# Altium PCB ProbeControl.PcbDoc (part 1 of 2)
Units mm, origin at the board's own origin, x right, y up, seen from the top; angles counter-clockwise.
Board outline 75 x 40.82 mm, 6 copper layers (L1, L2, L3, L4, L5, L6), stack 1.539 mm thick; 83 components, 74 nets, 352 pads, 245 vias.
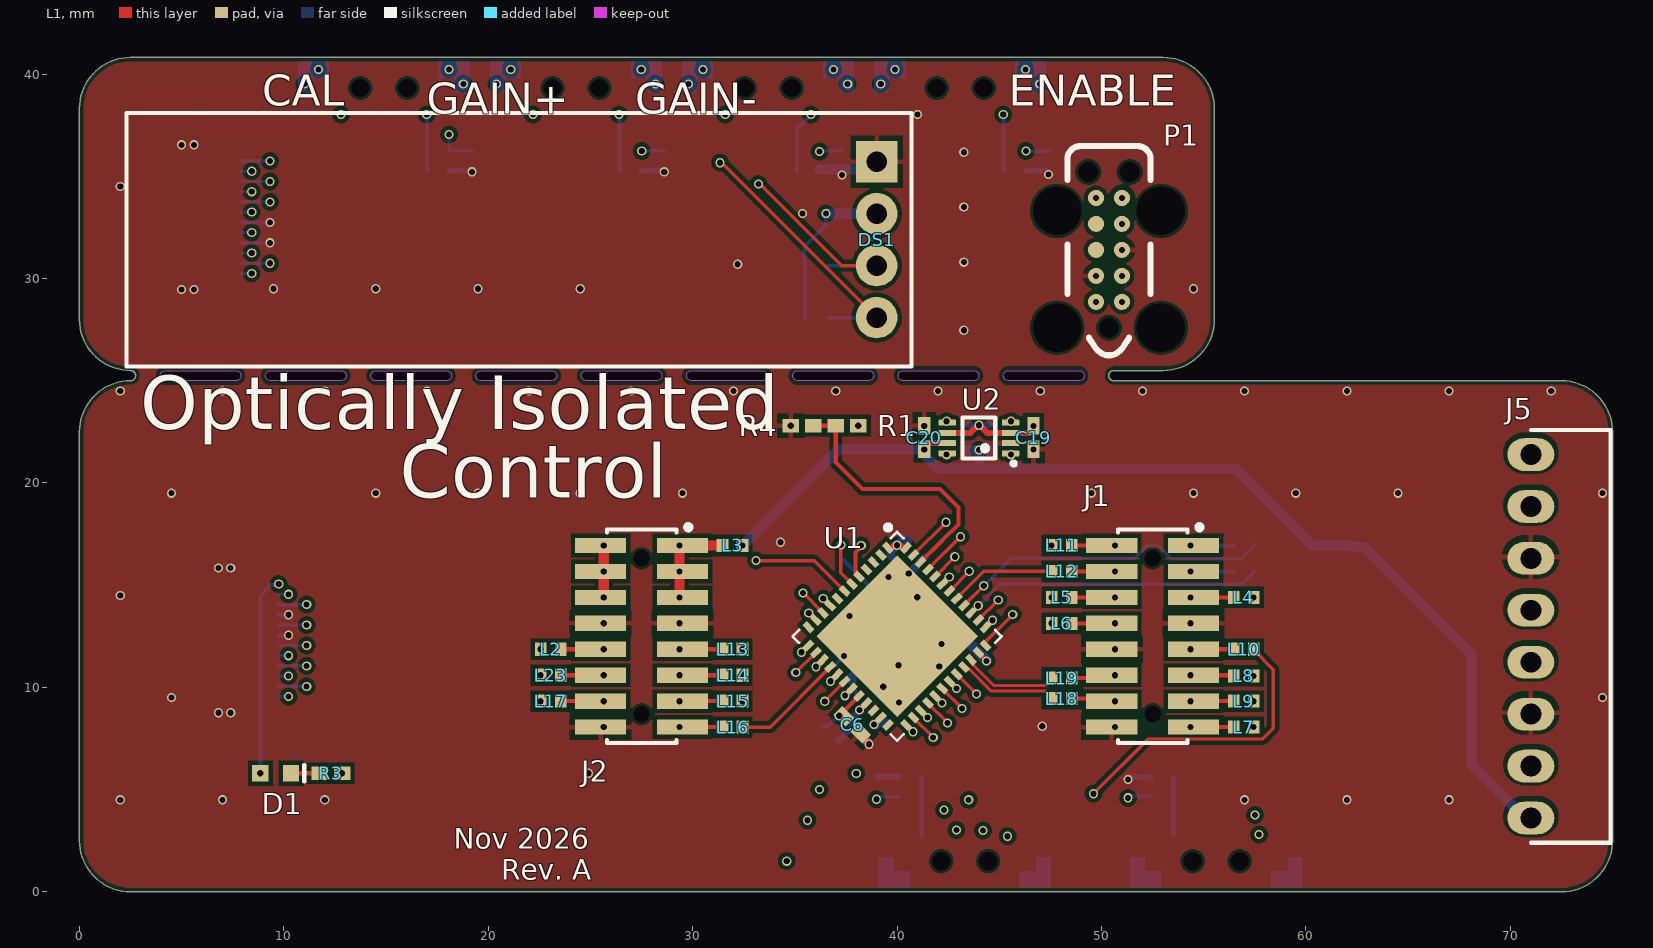
[diagram p0: L1 view]
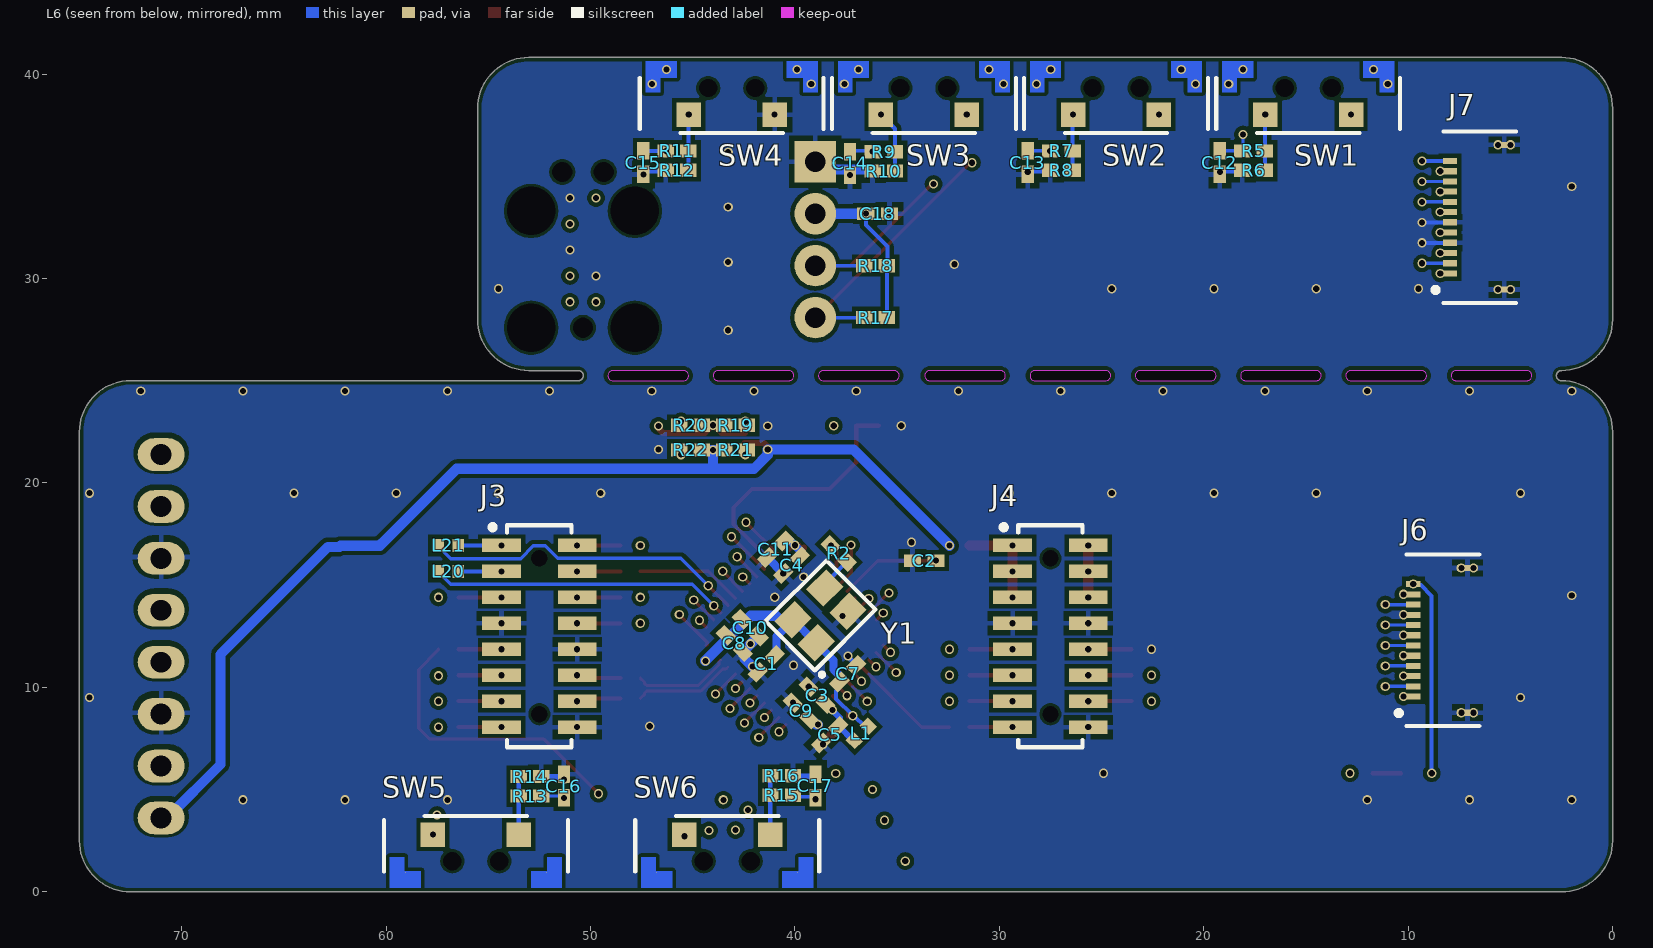
[diagram p1: L6 view, seen from below]
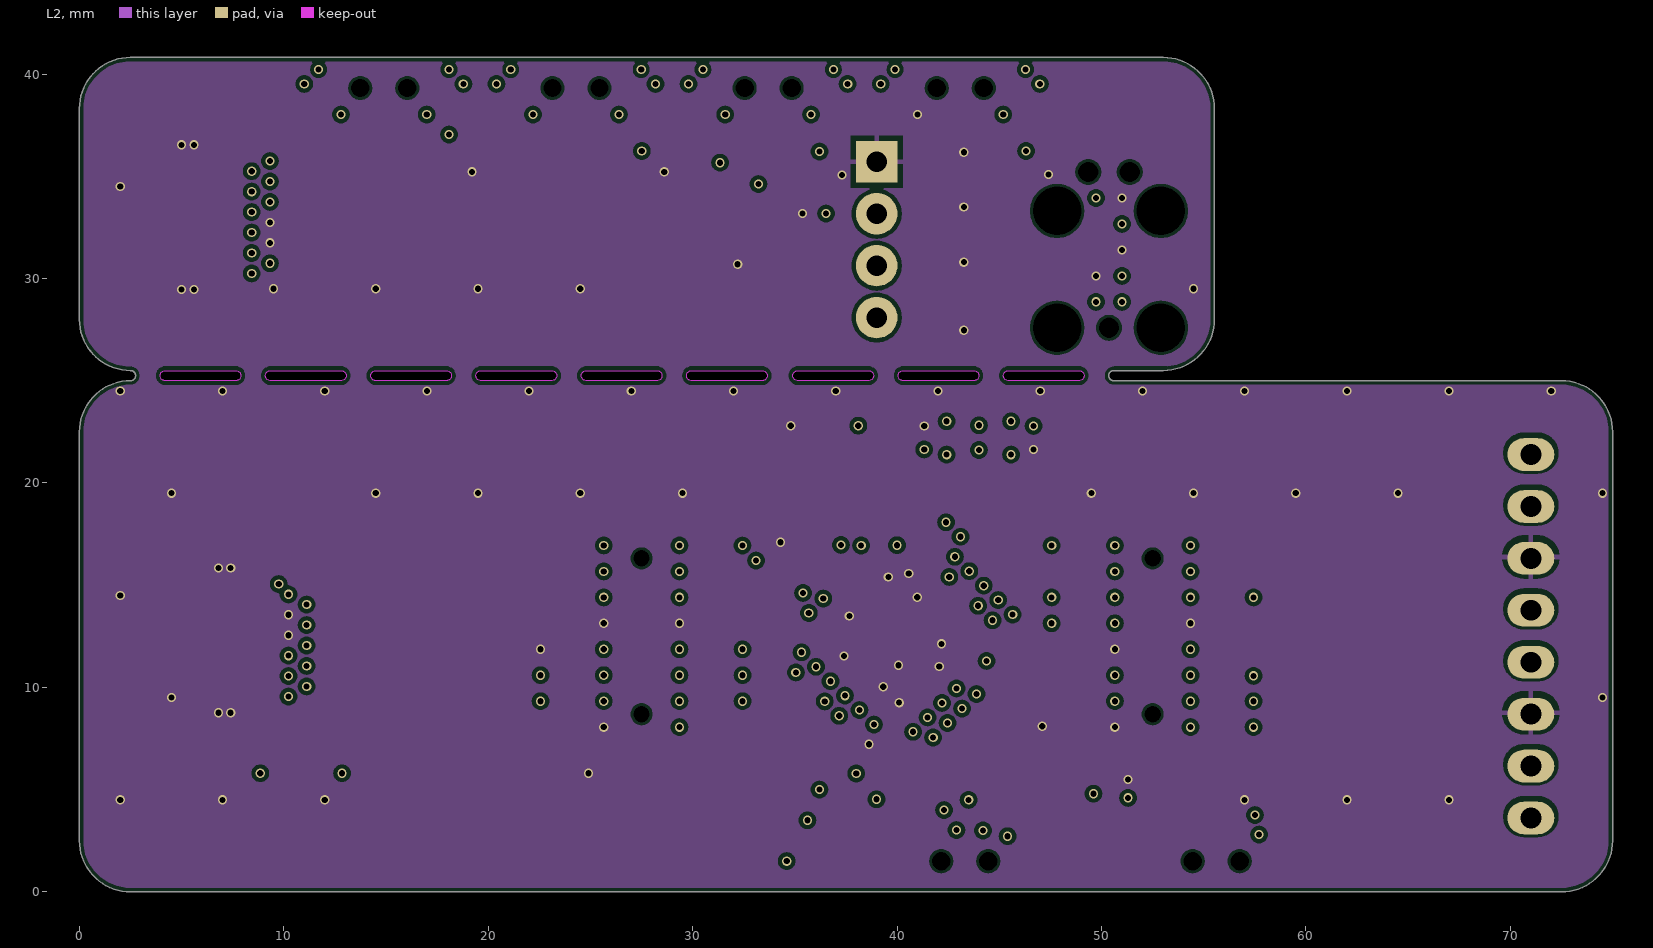
[diagram p2: L2]
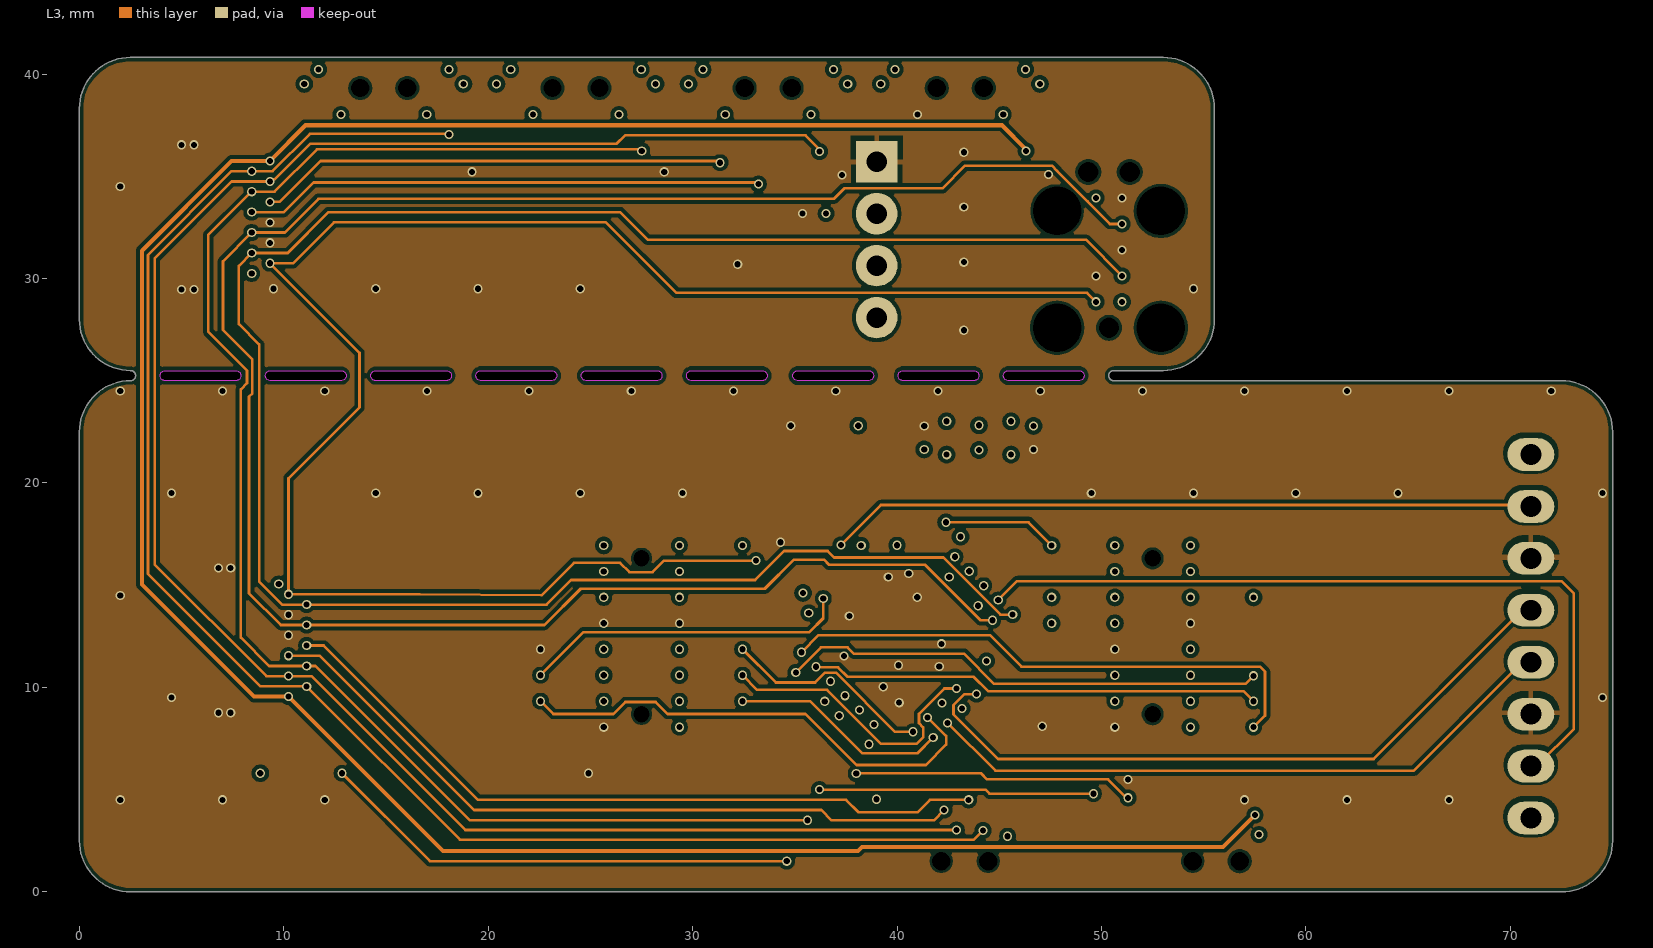
[diagram p3: L3]
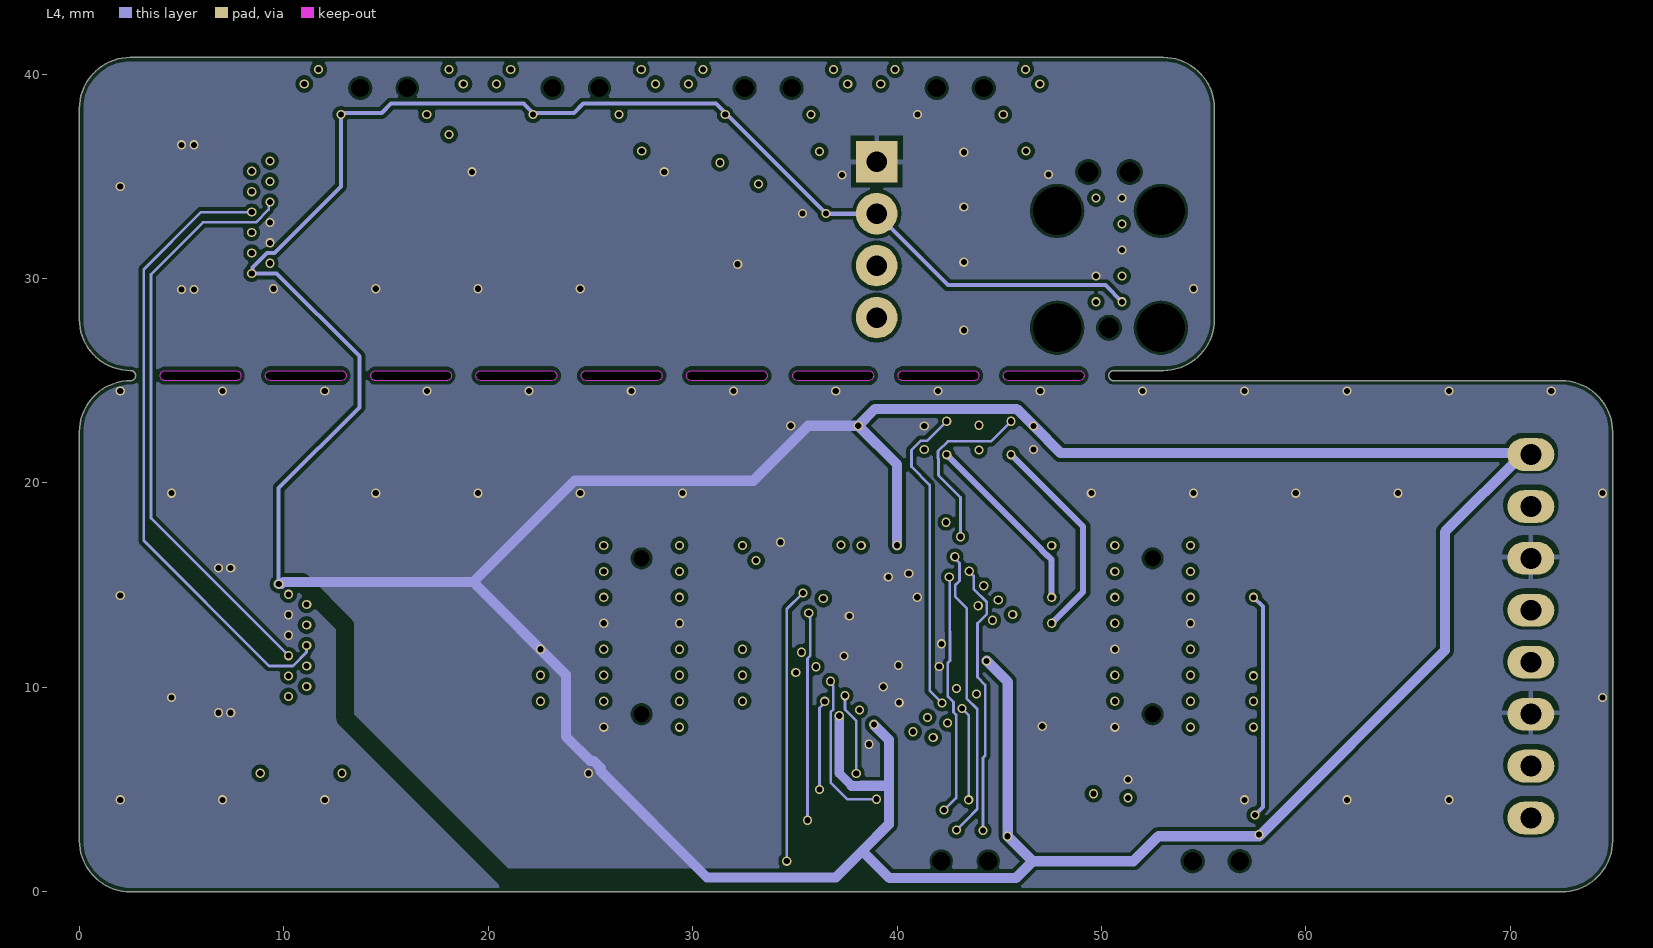
[diagram p4: L4]
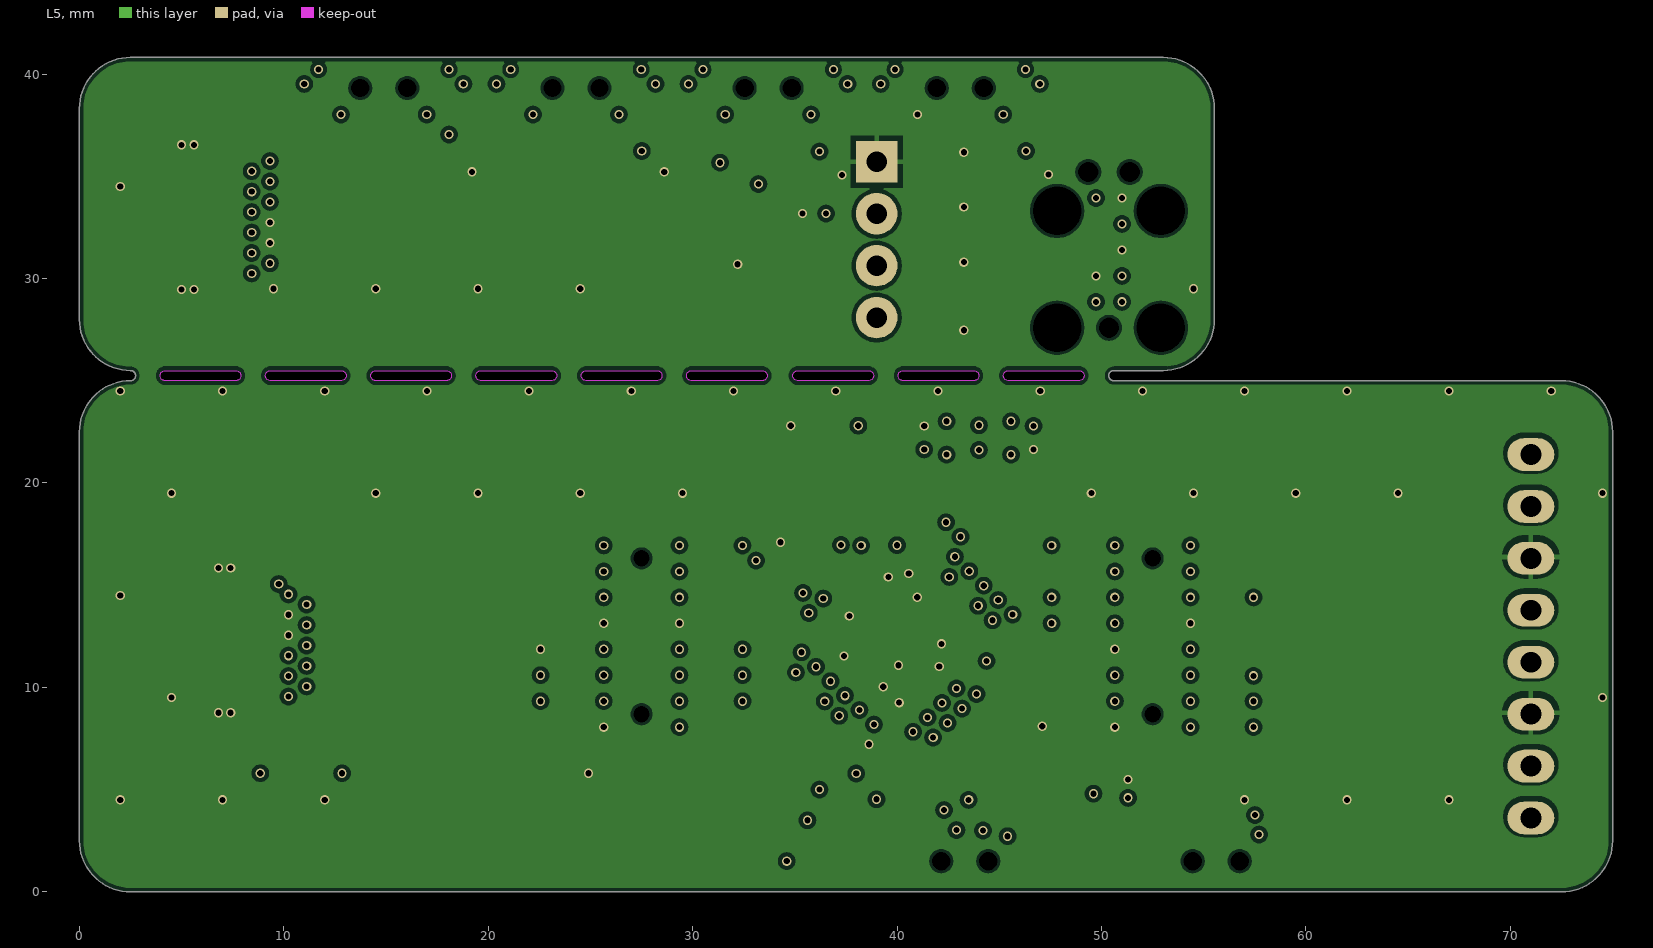
[diagram p5: L5]

## Layer stack, top to bottom
Top Solder: solder mask 0.0102, Solder Resist, Dk 3.5
L1: signal copper 0.0356
Dielectric 2: prepreg 0.0994, PP-006, Dk 4.1
L2: signal copper 0.0152
Dielectric 4: prepreg 0.55, PP-006, Dk 4.1
L3: signal copper 0.0152
Dielectric 1: dielectric 0.1088, FR-4, Dk 4.8
L4: signal copper 0.0152
Dielectric 5: prepreg 0.55, PP-006, Dk 4.1
L5: signal copper 0.0152
Dielectric 3: prepreg 0.0994, PP-006, Dk 4.1
L6: signal copper 0.0356
Bottom Solder: solder mask 0.0102, Solder Resist, Dk 3.5

## Board outline
0,2.5 ccw(c2.5,2.5) 2.5,0 72.5,0 ccw(c72.5,2.5) 75,2.5 75,22.5 ccw(c72.5,22.5) 72.5,25 53.018,25 50.599,25 cw(c50.599,25.25) 50.599,25.5 53.018,25.5 ccw(c53.018,28) 55.518,28 55.518,38.318 ccw(c53.018,38.318) 53.018,40.818 2.5,40.818 ccw(c2.5,38.318) 0,38.318 0,28 ccw(c2.5,28) 2.5,25.5 cw(c2.5,25.25) 2.5,25 ccw(c2.5,22.5) 0,22.5
cut-out: 35.149,25 cw(c35.149,25.25) 35.149,25.5 38.599,25.5 cw(c38.599,25.25) 38.599,25
cut-out: 40.299,25 cw(c40.299,25.25) 40.299,25.5 43.749,25.5 cw(c43.749,25.25) 43.749,25
cut-out: 45.449,25 cw(c45.449,25.25) 45.449,25.5 48.899,25.5 cw(c48.899,25.25) 48.899,25
cut-out: 19.65,25 cw(c19.65,25.25) 19.65,25.5 23.1,25.5 cw(c23.1,25.25) 23.1,25
cut-out: 24.8,25 cw(c24.8,25.25) 24.8,25.5 28.25,25.5 cw(c28.25,25.25) 28.25,25
cut-out: 29.95,25 cw(c29.95,25.25) 29.95,25.5 33.4,25.5 cw(c33.4,25.25) 33.4,25
cut-out: 14.5,25 cw(c14.5,25.25) 14.5,25.5 17.95,25.5 cw(c17.95,25.25) 17.95,25
cut-out: 9.35,25 cw(c9.35,25.25) 9.35,25.5 12.8,25.5 cw(c12.8,25.25) 12.8,25
cut-out: 4.2,25 cw(c4.2,25.25) 4.2,25.5 7.65,25.5 cw(c7.65,25.25) 7.65,25

## Design rules (kind name [scope] priority, off if disabled: settings)
BoardOutlineClearance BoardOutlineClearance_Exceptions [HasFootprint('GCT_USB4110-GF-A') Or HasFootprint('INDUSTRIALFIBEROPTICS_IF-E99B')] p1: gap=0 ignorepadtopadclearanceinfootprint=FALSE
BoardOutlineClearance [All] p2: gap=0.2 ignorepadtopadclearanceinfootprint=FALSE
Clearance Clearance_MOLEX_2171800001 [HasFootprint('MOLEX_2171800001') vs HasFootprint('MOLEX_2171800001')] p1: gap=0.13 ignorepadtopadclearanceinfootprint=FALSE except(0.07: Arc-Hole Track-Hole SMDPad-Hole THPad-Hole Via-Hole Fill-Hole Poly-Hole Region-Hole Text-Hole; 0.2: Arc-Fill Arc-Poly Track-Fill Track-Poly SMDPad-Fill SMDPad-Poly THPad-Fill THPad-Poly Via-Fill Via-Poly Fill-Fill Fill-Poly Poly-Poly)
Clearance [All] p2: gap=0.13 ignorepadtopadclearanceinfootprint=FALSE except(0.127: Track-Track; 0.2: Arc-Fill Arc-Poly Track-Fill Track-Poly SMDPad-Fill SMDPad-Poly THPad-Fill THPad-Poly Via-Fill Via-Poly Fill-Fill Fill-Poly Poly-Poly)
ComponentClearance [All] p1: gap=0 collisioncheckmode=3 verticalgap=0.254 showdistances=FALSE
DiffPairsRouting DiffPairsRouting_D90 [InDifferentialPairClass('D90')] p1: maxlimit=0.254 minlimit=0.127 mostfreqgap=0.254 toplayer_maxgap=0.127 toplayer_prefgap=0.127 toplayer_minwidth=0.148 toplayer_maxwidth=0.148 toplayer_prefwidth=0.148 bottomlayer_maxgap=0.127 bottomlayer_prefgap=0.127 bottomlayer_minwidth=0.148 bottomlayer_maxwidth=0.148 bottomlayer_prefwidth=0.148 impedanceprofiledriven=TRUE impedanceprofileid={FA5F725B-2402-4BBC-8DDC-20E1A5B3B00E} impedanceprofilevalue=90.000000 maxuncoupledlength=12.7
DiffPairsRouting [All] p2: maxlimit=0.254 minlimit=0.254 mostfreqgap=0.254 toplayer_minwidth=0.381 toplayer_maxwidth=0.381 toplayer_prefwidth=0.381 midlayer1_minwidth=0.381 midlayer1_maxwidth=0.381 midlayer1_prefwidth=0.381 midlayer2_minwidth=0.381 midlayer2_maxwidth=0.381 midlayer2_prefwidth=0.381 midlayer3_minwidth=0.381 midlayer3_maxwidth=0.381 midlayer3_prefwidth=0.381 midlayer4_minwidth=0.381 midlayer4_maxwidth=0.381 midlayer4_prefwidth=0.381 bottomlayer_minwidth=0.381 bottomlayer_maxwidth=0.381 bottomlayer_prefwidth=0.381 maxuncoupledlength=12.7
FabricationTestpoint [All] p1: side=3 testpointundercomponent=TRUE minsize=1.016 maxsize=2.54 preferedsize=1.524 minholesize=0 maxholesize=1.016 preferedholesize=0.813 testpointgrid=0.025 allowsidetop=TRUE allowsidebottom=TRUE usegrid=TRUE gridoriginx=0 gridoriginy=-98 gridtolerance=0
FanoutControl Fanout_BGA [IsBGA] p1 off: bgadir=Out bgaviamode=Centered fanoutstyle=Auto fanoutdirection=Alternating viagrid=0.025 // Fanout_BGA (Default Rule)
FanoutControl Fanout_LCC [IsLCC] p2 off: bgadir=Out bgaviamode=Centered fanoutstyle=Auto fanoutdirection=Alternating viagrid=0.025 // Fanout_LCC (Default Rule)
FanoutControl Fanout_SOIC [IsSOIC] p3 off: bgadir=Out bgaviamode=Centered fanoutstyle=Auto fanoutdirection=Alternating viagrid=0.025 // Fanout_SOIC (Default Rule)
FanoutControl Fanout_Small [(CompPinCount < 5)] p4 off: bgadir=Out bgaviamode=Centered fanoutstyle=Auto fanoutdirection=OutThenIn viagrid=0.025 // Fanout_Small (Default Rule)
FanoutControl Fanout_Default [All] p5 off: bgadir=Out bgaviamode=Centered fanoutstyle=Auto fanoutdirection=Alternating viagrid=0.025 // Fanout_Default (Default Rule)
HoleSize [All] p1: absolutevalues=TRUE maxlimit=6 minlimit=0.3 maxpercent=80.000 minpercent=20.000
HoleToHoleClearance HoleToHoleClearance_Via [IsVia vs IsVia] p1: gap=0.2 allowstackedmicrovias=TRUE
HoleToHoleClearance [All] p2: gap=0.45 allowstackedmicrovias=TRUE
MinimumAnnularRing [All] p1: minimumring=0.075
MinimumSolderMaskSliver [All] p1: minsoldermaskwidth=0.1
PlaneConnect [All] p1: pad.planeconnectstyle=Relief pad.reliefexpansion=0.508 pad.reliefentries=4 pad.reliefconductorwidth=0.254 pad.reliefairgap=0.254 via.planeconnectstyle=Direct via.reliefexpansion=0.508 via.reliefentries=4 via.reliefconductorwidth=0.254 via.reliefairgap=0.254
PolygonConnect [All] p1: thpad.connectstyle=Relief thpad.reliefconductorwidth=0.254 thpad.reliefentries=4 thpad.polygonreliefangle="90 Angle" thpad.airgapwidth=0.254 smdpad.connectstyle=Relief smdpad.reliefconductorwidth=0.254 smdpad.reliefentries=4 smdpad.polygonreliefangle="90 Angle" smdpad.airgapwidth=0.254 via.connectstyle=Direct via.reliefconductorwidth=0.254 via.reliefentries=4 via.polygonreliefangle="90 Angle" via.airgapwidth=0.254
RoutingVias [All] p1: holewidth=0.3 width=0.45 viastyle="Through Hole" minholewidth=0.3 minwidth=0.45 maxholewidth=0.5 maxwidth=1
SilkToSilkClearance [All] p1: silktosilkclearance=0.001
SilkToSolderMaskClearance [IsPad] p1: minsilkscreentomaskgap=0.001 clearancetoexposedcopper=TRUE
SolderMaskExpansion SolderMaskExpansion_Via [IsVia] p1: expansion=0.102 istentingtop=TRUE
SolderMaskExpansion [All] p2: expansion=0.05 istentingtop=FALSE
SupplyNets "Schematic Supply Nets" [InNet('+3V3.CMN')] p1: voltage=0.000
SupplyNets "Schematic Supply Nets_12" [InNet('+3V3')] p2: voltage=0.000
SupplyNets "Schematic Supply Nets_11" [InNet('+5V0')] p3: voltage=0.000
SupplyNets "Schematic Supply Nets_10" [InNet('-5V0AMP')] p4: voltage=0.000
SupplyNets "Schematic Supply Nets_7" [InNet('+5V0AMP')] p5: voltage=0.000
SupplyNets "Schematic Supply Nets_2" [InNet('COM')] p6: voltage=0.000
UnRoutedNet [All] p1: checkbadconnections=TRUE
Width Width_S50 [InNetClass('S50')] p1: maxlimit=0.254 minlimit=0.131 preferedwidth=0.254 toplayer_minwidth=0.165 toplayer_maxwidth=0.165 toplayer_prefwidth=0.165 midlayer3_maxwidth=0.131 midlayer3_prefwidth=0.131 midlayer4_maxwidth=0.131 midlayer4_prefwidth=0.131 bottomlayer_minwidth=0.165 bottomlayer_maxwidth=0.165 bottomlayer_prefwidth=0.165 impedanceprofiledriven=TRUE impedanceprofileid={9C593259-F8B5-4AAC-BFBE-A260B8E997F9} impedanceprofilevalue=50.000000 minimp=50.000000 maximp=50.000000 favimp=50.000000
Width [All] p2: maxlimit=2 minlimit=0.2 preferedwidth=0.4
15 further rules are at their usual default settings.

## Classes and differential pairs
component class EC: J6 J7
differential pair class D90: USB.D
net class S50: Analog0 Analog1 Analog2 Analog3 Analog4 BTN.CAL BTN.Spare0 BTN.Spare1 BTN.VScale.Down BTN.VScale.Up DISP.SCL DISP.SDA FIBER.Rx FIBER.Tx GPIO1 I2C4_SCL I2C4_SDA LED.GREEN SPI1.MISO SPI1.MOSI SPI1.SCK SPI1_CS1 SPI1_CS2 SPI2.MISO SPI2.MOSI SPI2.SCK SPI2_CS SW.CLK SW.DIO SW.nRST VBat0 VBat1
component class "U_Oscilloscope Interface": J5
component class DISP: C18 DS1 R17 R18
component class CONN: J1 J2 J3 J4 L2 L3 L4 L5 L6 L7 L8 L9 L10 L11 L12 L13 L14 L15 L16 L17 L18 L19 L20 L21 L23
component class SW: C12 C13 C14 C15 C16 C17 R5 R6 R7 R8 R9 R10 R11 R12 R13 R14 R15 R16 SW1 SW2 SW3 SW4 SW5 SW6
component class MCU: C1 C2 C3 C4 C5 C6 C7 C8 C9 C10 C11 D1 L1 P1 R1 R2 R3 R4 U1 Y1
component class ILS: C19 C20 R19 R20 R21 R22 U2
differential pair USB.D: +USB.D_P -USB.D_N

## Components (designator, comment, footprint, x,y, rotation, side; value= is the part's Value field where it differs from the comment)
C1 "100nF,10%,50V,X7R,0402" CAPC1005X06N 41.395,11.149 r315 bottom value=100n
C2 "100nF,10%,50V,X7R,0402" CAPC1005X06N 33.675,16.2 r180 bottom value=100n
C3 "100nF,10%,50V,X7R,0402" CAPC1005X06N 38.917,9.623 r45 bottom value=100n
C4 "100nF,10%,50V,X7R,0402" CAPC1005X06N 40.163,15.98 r315 bottom value=100n
C5 "10u" CAPC1005X06N 38.302,7.683 r135 bottom
C6 "10u" CAPC1005X06N 37.807,8.178 r135 top
C7 "100nF,10%,50V,X7R,0402" CAPC1005X06N 37.412,10.67 r135 bottom value=100n
C8 "10u" CAPC1005X06N 42.961,12.149 r45 bottom
C9 "100nF,10%,50V,X7R,0402" CAPC1005X06N 39.695,8.845 r45 bottom value=100n
C10 "100nF,10%,50V,X7R,0402" CAPC1005X06N 42.183,12.927 r225 bottom value=100n
C11 "100nF,10%,50V,X7R,0402" CAPC1005X06N 40.944,16.756 r315 bottom value=100n
C12 "1nF,1%,50V,C0G,0402" CAPC1005X06N 19.211,35.668 r90 bottom value=1n
C13 "1nF,1%,50V,C0G,0402" CAPC1005X06N 28.611,35.668 r90 bottom value=1n
C14 "1nF,1%,50V,C0G,0402" CAPC1005X06N 37.3,35.636 r90 bottom value=1n
C15 "1nF,1%,50V,C0G,0402" CAPC1005X06N 47.411,35.668 r90 bottom value=1n
C16 "1nF,1%,50V,C0G,0402" CAPC1005X06N 51.3,5.173 r270 bottom value=1n
C17 "1nF,1%,50V,C0G,0402" CAPC1005X06N 38.992,5.181 r270 bottom value=1n
C18 "10u" CAPC1005X06N 35.95,33.175 r0 bottom
C19 "100nF,10%,50V,X7R,0402" CAPC1005X06N 46.675,22.217 r90 top value=100n
C20 "100nF,10%,50V,X7R,0402" CAPC1005X06N 41.325,22.217 r270 top value=100n
D1 "Green" LITE-ON_LTST-C190KGKT 9.6,5.8 r0 top
DS1 "HS91L02W2C01" HS_HS91L02W2C01 21.5,31.9 r180 top
J1 "HX PZ1.27-2x8P TP" "HANXIA_HX PZ1.27-2x8P TP" 52.5,12.5 r0 top
J2 "HX PZ1.27-2x8P TP" "HANXIA_HX PZ1.27-2x8P TP" 27.5,12.5 r0 top
J3 "PM127-2-08-S-4.3" HCTL_PM127-2-08-S-4.3 52.5,12.5 r180 bottom
J4 "PM127-2-08-S-4.3" HCTL_PM127-2-08-S-4.3 27.5,12.5 r180 bottom
J5 "PH1RB-08-UA" ADAMTECH_PH1RB-08-UA 71,12.5 r270 top
J6 "5034801200" MOLEX_5034801200 8.3,12.3 r270 bottom locked
J7 "5034801200" MOLEX_5034801200 6.5,33 r270 bottom locked
L1 "470R,0402" INDC1005X05N 36.754,7.746 r135 bottom value=470
L2 "470R" INDC1005X05N 23.05,11.865 r0 top
L3 "470R" INDC1005X05N 31.95,16.945 r180 top
L4 "470R" INDC1005X05N 56.95,14.405 r180 top
L5 "470R" INDC1005X05N 48.05,14.405 r0 top
L6 "470R" INDC1005X05N 48.05,13.135 r0 top
L7 "470R" INDC1005X05N 56.95,8.055 r180 top
L8 "470R" INDC1005X05N 56.95,10.566 r180 top
L9 "470R" INDC1005X05N 56.95,9.325 r180 top
L10 "470R" INDC1005X05N 56.95,11.865 r180 top
L11 "470R" INDC1005X05N 48.05,16.945 r0 top
L12 "470R" INDC1005X05N 48.05,15.675 r0 top
L13 "470R" INDC1005X05N 31.95,11.865 r180 top
L14 "470R" INDC1005X05N 31.95,10.595 r180 top
L15 "470R" INDC1005X05N 31.95,9.325 r180 top
L16 "470R" INDC1005X05N 31.95,8.055 r180 top
L17 "470R" INDC1005X05N 23.05,9.325 r0 top
L18 "470R" INDC1005X05N 48.05,9.454 r0 top
L19 "470R" INDC1005X05N 48.05,10.454 r0 top
L20 "470R" INDC1005X05N 56.95,15.675 r180 bottom
L21 "470R" INDC1005X05N 56.95,16.945 r180 bottom
L23 "470R" INDC1005X05N 23.05,10.595 r0 top
P1 "TC2050" TAGCONNECT_TC2050-FP 50.365,32.67 r90 top locked
R1 "10k,1%,0.063W,0402" RESC1005X04N 37.55,22.8 r0 top value=10k
R2 "24R9,1%,0.063W,0402" RESC1005X04N 37.853,16.552 r45 bottom value=24.9
R3 "1k,1%,0.063W,0402" RESC1005X04N 12.3,5.8 r180 top value=1k
R4 "10k,1%,0.063W,0402" RESC1005X04N 35.35,22.8 r0 top value=10k
R5 "1k,5%,0.063W,0402" RESC1005X04N 17.561,36.24 r0 bottom value=1k
R6 "10k,1%,0.063W,0402" RESC1005X04N 17.561,35.29 r180 bottom value=10k
R7 "1k,5%,0.063W,0402" RESC1005X04N 26.961,36.24 r0 bottom value=1k
R8 "10k,1%,0.063W,0402" RESC1005X04N 26.961,35.29 r180 bottom value=10k
R9 "1k,5%,0.063W,0402" RESC1005X04N 35.65,36.208 r0 bottom value=1k
R10 "10k,1%,0.063W,0402" RESC1005X04N 35.65,35.258 r180 bottom value=10k
R11 "1k,5%,0.063W,0402" RESC1005X04N 45.761,36.242 r0 bottom value=1k
R12 "10k,1%,0.063W,0402" RESC1005X04N 45.761,35.29 r180 bottom value=10k
R13 "1k,5%,0.063W,0402" RESC1005X04N 52.95,4.687 r180 bottom value=1k
R14 "10k,1%,0.063W,0402" RESC1005X04N 52.95,5.637 r0 bottom value=10k
R15 "1k,5%,0.063W,0402" RESC1005X04N 40.642,4.73 r180 bottom value=1k
R16 "10k,1%,0.063W,0402" RESC1005X04N 40.642,5.68 r0 bottom value=10k
R17 "Omit" RESC1005X04N 36.05,28.09 r180 bottom
R18 "Omit" RESC1005X04N 36.05,30.63 r180 bottom
R19 "Omit" RESC1005X04N 42.9,22.82 r0 bottom
R20 "Omit" RESC1005X04N 45.1,22.82 r180 bottom
R21 "Omit" RESC1005X04N 42.9,21.613 r0 bottom
R22 "Omit" RESC1005X04N 45.1,21.613 r180 bottom
SW1 "SPST-NO,RA,TH,TS36CA-0.6 250gf 031" "SHOU_HAN_TS36CA-0.6 250gf 031" 14.891,37.818 r0 bottom value="TS36CA-0.6 250gf 031"
SW2 "SPST-NO,RA,TH,TS36CA-0.6 250gf 031" "SHOU_HAN_TS36CA-0.6 250gf 031" 24.291,37.818 r0 bottom value="TS36CA-0.6 250gf 031"
SW3 "SPST-NO,RA,TH,TS36CA-0.6 250gf 031" "SHOU_HAN_TS36CA-0.6 250gf 031" 33.691,37.818 r0 bottom value="TS36CA-0.6 250gf 031"
SW4 "SPST-NO,RA,TH,TS36CA-0.6 250gf 031" "SHOU_HAN_TS36CA-0.6 250gf 031" 43.091,37.818 r0 bottom value="TS36CA-0.6 250gf 031"
SW5 "SPST-NO,RA,TH,TS36CA-0.6 250gf 031" "SHOU_HAN_TS36CA-0.6 250gf 031" 55.607,3 r180 bottom value="TS36CA-0.6 250gf 031"
SW6 "SPST-NO,RA,TH,TS36CA-0.6 250gf 031" "SHOU_HAN_TS36CA-0.6 250gf 031" 43.307,3 r180 bottom value="TS36CA-0.6 250gf 031"
U1 "STM32G473CBU6" ST_PKG_UFQFN48_A0B9 40,12.5 r315 top
U2 "TCA9406DCUR" TEXASINSTRUMENTS_PKG_DCU0008A 44,22.2 r180 top
Y1 "8.0000MHz,50ppm,15pF,SMD" ECS_PKG_3225MV 38.746,13.52 r135 bottom

## Footprints (in the part's own frame and the unit in brackets; to place one, negate y for a bottom-side part, rotate by r counter-clockwise, add the part's x,y. Pads: shape width x height; smd on the part's side, far side on the other; paste and mask are expansions set on the pad)
ADAMTECH_PH1RB-08-UA [mm] "ADAMTECH_PH1RB-08-UA"
  oval 1.6x2.3 hole 1.02 mask+0.05: 1(-8.89,0) 2(-6.35,0) 3(-3.81,0) 4(-1.27,0) 5(1.27,0) 6(3.81,0) 7(6.35,0) 8(8.89,0)
  silkscreen extent -10.1,0 10.1,3.9, body extent -10.16,-0.32 10.16,9.9, height 2.55
CAPC1005X06N [mm]
  rect 0.85x0.6 smd: 1(-0.575,0) 2(0.575,0)
  body extent -0.53,-0.28 0.53,0.27, height 0.55
ECS_PKG_3225MV [mm]
  rect 1.4x1.2 smd: 1(-1.1,-0.8) 2(1.1,-0.8) 3(1.1,0.8) 4(-1.1,0.8)
  silkscreen extent -2.1,-2.2 2.1,1.7, body extent -1.6,-1.25 1.6,1.25, height 1.21
"HANXIA_HX PZ1.27-2x8P TP" [mm]
  rect 2.5x0.74 smd: 1(2,4.445) 2(-2,4.445) 3(2,3.175) 4(-2,3.175) 5(2,1.905) 6(-2,1.905) 7(2,0.635) 8(-2,0.635) 9(2,-0.635) 10(-2,-0.635) 11(2,-1.905) 12(-2,-1.905) 13(2,-3.175) 14(-2,-3.175) 15(2,-4.445) 16(-2,-4.445)
  silkscreen extent -1.7,-5.23 2.41,5.46, body extent -2.75,-5.09 2.75,5.07, height 4.69
HCTL_PM127-2-08-S-4.3 [mm]
  rect 1.9x0.66 smd: 1(-1.85,4.445) 2(1.85,4.445) 3(-1.85,3.175) 4(1.85,3.175) 5(-1.85,1.905) 6(1.85,1.905) 7(-1.85,0.635) 8(1.85,0.635) 9(-1.85,-0.635) 10(1.85,-0.635) 11(-1.85,-1.905) 12(1.85,-1.905) 13(-1.85,-3.175) 14(1.85,-3.175) 15(-1.85,-4.445) 16(1.85,-4.445)
  round 0 hole 0.8 unplated: ""(0,-3.81) ""(0,3.81)
  silkscreen extent -2.41,-5.43 1.57,5.46, body extent -2.25,-5.26 2.25,5.26, height 3.61
HS_HS91L02W2C01 [mm]
  rect 2.032x2.032 hole 1: 1(-17.5,-3.81)
  round 2.032 hole 1: 2(-17.5,-1.27) 3(-17.5,1.27) 4(-17.5,3.81)
  silkscreen extent -19.2,-6.2 19.2,6.2, body extent -19,-6 19,6, height 2.6
INDC1005X05N [mm] "Chip Inductor, 2-Leads, Body 1.00x0.50mm, IPC Medium Density"
  rect 0.57x0.64 smd: 1(-0.49,0) 2(0.49,0)
  body extent -0.5,-0.25 0.5,0.25, height 0.5
LITE-ON_LTST-C190KGKT [mm] "LITE-ON_LTST-C190KGKT"
  rect 0.8x0.8 smd: A(-0.75,0) C(0.75,0)
  silkscreen extent 1.4,-0.4 1.4,0.4, body extent -0.8,-0.4 0.8,0.4, height 0.8
MOLEX_5034801200 [mm]
  rect 0.3x0.7 smd: 1(-2.75,-1.45) 2(-2.25,-1.45) 3(-1.75,-1.45) 4(-1.25,-1.45) 5(-0.75,-1.45) 6(-0.25,-1.45) 7(0.25,-1.45) 8(0.75,-1.45) 9(1.25,-1.45) 10(1.75,-1.45) 11(2.25,-1.45) 12(2.75,-1.45)
  rect 0.3x1 smd: 13(-3.54,1.2) 13(3.54,1.2)
  silkscreen extent -4.19,-2.28 4.19,1.78, body extent -3.85,-2.09 3.85,1.91, height 1.03
RESC1005X04N [mm] "Chip Resistor, 2-Leads, Body 1.0x0.5mm, IPC Medium Density"
  rect 0.8x0.65 smd: 1(-0.55,0) 2(0.55,0)
  body extent -0.52,-0.27 0.53,0.28, height 0.4
"SHOU_HAN_TS36CA-0.6 250gf 031" [mm]
  round 0.025 smd: 0(-3.45,-2.05) 0(3.45,-2.05)
  round 0 hole 0.9 unplated: 0(-1.15,-1.5) 0(1.15,-1.5)
  rect 1.2x1.2 smd: 1(-2.1,-0.2) 2(2.1,-0.2)
  silkscreen extent -4.5,-2 4.5,0.7, body extent -3.94,-3.4 3.65,0.24, height 3.44
ST_PKG_UFQFN48_A0B9 [mm]
  rect 0.55x0.3 smd: 1(-3.375,2.75) 2(-3.375,2.25) 3(-3.375,1.75) 4(-3.375,1.25) 5(-3.375,0.75) 6(-3.375,0.25) 7(-3.375,-0.25) 8(-3.375,-0.75) 9(-3.375,-1.25) 10(-3.375,-1.75) 11(-3.375,-2.25) 12(-3.375,-2.75) 25(3.375,-2.75) 26(3.375,-2.25) 27(3.375,-1.75) 28(3.375,-1.25) 29(3.375,-0.75) 30(3.375,-0.25) 31(3.375,0.25) 32(3.375,0.75) 33(3.375,1.25) 34(3.375,1.75) 35(3.375,2.25) 36(3.375,2.75)
  rect 0.3x0.55 smd: 13(-2.75,-3.375) 14(-2.25,-3.375) 15(-1.75,-3.375) 16(-1.25,-3.375) 17(-0.75,-3.375) 18(-0.25,-3.375) 19(0.25,-3.375) 20(0.75,-3.375) 21(1.25,-3.375) 22(1.75,-3.375) 23(2.25,-3.375) 24(2.75,-3.375) 37(2.75,3.375) 38(2.25,3.375) 39(1.75,3.375) 40(1.25,3.375) 41(0.75,3.375) 42(0.25,3.375) 43(-0.25,3.375) 44(-0.75,3.375) 45(-1.25,3.375) 46(-1.75,3.375) 47(-2.25,3.375) 48(-2.75,3.375)
  rect 5.6x5.6 smd paste-2.8: 49(0,0)
  silkscreen extent -4.2,-3.61 3.61,3.61, body extent -3.55,-3.55 3.55,3.55, height 0.6
TAGCONNECT_TC2050-FP [mil]
  round 31 smd paste-15.5: 1(-150,-25) 2(-100,-25) 3(-50,-25) 4(0,-25) 5(50,-25) 6(50,25) 7(0,25) 8(-50,25) 9(-100,25) 10(-150,25)
  round 0 hole 93.5 unplated paste-99999: ""(-200,-100) ""(-200,100) ""(25,100) ""(25,-100)
  round 0 hole 39 unplated paste-99999: ""(-200,0) ""(100,-40) ""(100,40)
  silkscreen extent -253,-80 150,80
TEXASINSTRUMENTS_PKG_DCU0008A [mm]
  rrect25% 0.85x0.3 smd paste+0 mask+0.05: 1(-1.55,0.75) 2(-1.55,0.25) 3(-1.55,-0.25) 4(-1.55,-0.75) 5(1.55,-0.75) 6(1.55,-0.25) 7(1.55,0.25) 8(1.55,0.75)
  silkscreen extent -1.8,-1 0.8,1.35, body extent -1.55,-1 1.55,1, height 0.9

## Part data
C1 C2 C3 C4 C7 C9 C10 C11 C19 C20: library part CAP,Cer,100nF,10%,50V,X7R,0402, "50V 100nF X7R Â±10% 0402 Ceramic Capacitors ROHS", Manufacturer 1=Murata, Manufacturer 1 Part Number=GRM155R71H104KE14D, Vendor 1 Part Number=C77020, CreatedBy="Judd Foster", HelpURL=https://www.lcsc.com/datasheet/C77020.pdf, Part Name=CAP,Cer,100nF,10%,50V,X7R,0402, Vendor 1=LCSC
C5 C6 C8 C18: library part CAP,Cer,10uF,10VDC,X5R,0402, "10 ï¿½F ï¿½20% 10V Ceramic Capacitor X5R 0402 (1005 Metric)", Manufacturer 1="Samsung Electro-Mechanics", Manufacturer 1 Part Number=CL05A106MP5NUNC, Vendor 1 Part Number=1276-1450-1-ND, CreatedBy="Judd Foster", HelpURL=https://media.digikey.com/pdf/Data%20Sheets/Samsung%20PDFs/CL05A106MP5NUNC_Spec.pdf, Part Name=CAP,Cer,10uF,10VDC,X5R,0402, Vendor 1=Digikey
C12 C13 C14 C15 C16 C17: library part CAP,CER,1nF,1%,50V,C0G,0402, "CAP,CER,1nF,1%,50V,C0G,0402", Manufacturer 1=Murata, Manufacturer 1 Part Number=GCM1555C1H102FA16D, CreatedBy="Kevin Heyer", HelpURL=https://pim.murata.com/asset/pim4/ceramicCapacitorSMD/GCM1555C1H102FA16-01A-EN_PDF_CERAMICCAPACITORSMD, Part Name=CAP,CER,1nF,1%,50V,C0G,0402
D1: library part LED,Green,SMD,0603, "Green 571nm LED Indication - Discrete 2V 0603 (1608 Metric)", Manufacturer 1="Lite-On Inc.", Manufacturer 1 Part Number=LTST-C190KGKT, Vendor 1 Part Number=160-1435-1-ND, CreatedBy="Judd Foster", HelpURL=https://optoelectronics.liteon.com/upload/download/DS22-2000-074/LTST-C190KGKT.PDF, Part Name=LED,Green,SMD,0603, Vendor 1=Digikey
DS1: library part DISP,Graphic,OLED,128x32,HS91L02W2C01, "0.91 128x32 SSD1306 chip I2C LCD, OLED, Graphic", Manufacturer 1=HS, Vendor 1 Part Number=C5248081, CreatedBy="Judd Foster", HelpURL=https://www.lcsc.com/datasheet/C5248081.pdf, Manufacturer 1 Part Number=HS91L02W2C01, Part Name=DISP,Graphic,OLED,128x32,HS91L02W2C01, Vendor 1=LCSC
J1 J2: library part "CONN,Hdr,2x8 Pin,1.27mm,SMD", "CONN HEADER 16POS 1.27mm DUAL ROW SMD", Manufacturer 1=hanxia, Vendor 1 Part Number=C41376040, CreatedBy="Judd Foster", HelpURL=https://www.lcsc.com/datasheet/C41376040.pdf?spm=wm.sxq.inf.ggs___wm.fly.bg.0.xh&lcsc_vid=T1ELXwUHQlNYVlZRE1JdXlRQFVgNBF1eTlFXBVxWRAAxVlNeQ1lYVlFUQlNXXjsOAxUeFF5JWBYZEEoKFBINSQcJGk4eFQsCAgIaSgADAwAHC0slRFhZUlVVQ08GEwkK, Manufacturer 1 Part Number="HX PZ1.27-2x8P TP", Part Name="CONN,Hdr,2x8 Pin,1.27mm,SMD", Vendor 1=LCSC
J3 J4: library part "CONN,Rcpt,2x8 Pin,1.27mm,SMD", "CONN SOCKET 16POS 1.27mm DUAL ROW SMD", Manufacturer 1=HCTL, Vendor 1 Part Number=C3975134, CreatedBy="Judd Foster", HelpURL=https://www.lcsc.com/datasheet/C3975134.pdf?spm=wm.sxq.inf.ggs___wm.fly.bg.0.xh&lcsc_vid=T1ELXwUHQlNYVlZRE1JdXlRQFVgNBF1eTlFXBVxWRAAxVlNeQ1lYVldfR1VbXjsOAxUeFF5JWBYZEEoKFBINSQcJGk4dAgUUFAk%3D, Manufacturer 1 Part Number=PM127-2-08-S-4.3, Part Name="CONN,Rcpt,2x8 Pin,1.27mm,SMD", Vendor 1=LCSC
J5: library part "Term,Header,1x8 Pin,2.54mm,Right,Thru", "Connector Header Through Hole, Right Angle 8 position 0.100\" (2.54mm)", Manufacturer 1="Adam Tech", Vendor 1 Part Number=2057-PH1RB-08-UA-ND, CreatedBy="Judd Foster", HelpURL=https://app.adam-tech.com/products/download/data_sheet/201281/ph1rb-xx-ua-data-sheet.pdf, Manufacturer 1 Part Number=PH1RB-08-UA, Part Name="Term,Header,1x8 Pin,2.54mm,Right,Thru", Vendor 1=Digikey
J6 J7: library part Conn,FPC,12pin,RA,0.5mm,5034801200, "CONN FFC FPC 12POS 0.5mm TOP AND BOTTOM CNT SMD R/A", Manufacturer 1=Molex, CreatedBy="Kevin Heyer", HelpURL=https://www.molex.com/content/dam/molex/molex-dot-com/products/automated/en-us/salesdrawingpdf/503/503480/5034801200_sd.pdf?inline\, Manufacturer 1 Part Number=5034801200, Part Name=Conn,FPC,12pin,RA,0.5mm,5034801200
L1 L2 L3 L4 L5 L6 L7 L8 L9 L10 L11 L12 L13 L14 L15 L16 L17 L18 L19 L20 L21 L23: library part Ferrite,470R@100MHz,0402, "470 Ohms @ 100 MHz 1 Power Line Ferrite Bead 0402 (1005 Metric) 1A 200mOhm", Manufacturer 1="Murata Electronics", Manufacturer 1 Part Number=BLM15PX471SN1D, Vendor 1 Part Number=490-10662-1-ND, CreatedBy="Judd Foster", HelpURL=https://www.murata.com/en-us/products/productdata/8796740059166/ENFA0018.pdf, Part Name=Ferrite,470R@100MHz,0402, Vendor 1=Digikey
P1: library part CONN,Tag-Connect,TC2050-IDC, "PLUG-OF-NAILS 10-PIN W/ LEGS 8\"", Manufacturer 1="Tag-Connect LLC", Manufacturer 1 Part Number=N/A, CreatedBy="Kevin Heyer", HelpURL=https://www.tag-connect.com/wp-content/uploads/bsk-pdf-manager/TC2050-IDC_Datasheet_7.pdf, Part Name=CONN,Tag-Connect,TC2050-IDC
R1 R4 R6 R8 R10 R12 R14 R16: library part RES,10k,1%,0.063W,0402, "RES 10K OHM 1% 1/16W 0402", Manufacturer 1="Vishay Dale", Manufacturer 1 Part Number=CRCW040210K0FKED, CreatedBy="Kevin Heyer", HelpURL=https://www.vishay.com/docs/20035/dcrcwe3.pdf, Part Name=RES,10k,1%,0.063W,0402
R2: library part RES,24R9,1%,0.063W,0402, "RES 24.9 OHM 1% 1/16W 0402", Manufacturer 1="Vishay Dale", Manufacturer 1 Part Number=CRCW040224R9FKED, CreatedBy="Kevin Heyer", HelpURL=https://www.vishay.com/docs/20035/dcrcwe3.pdf, Part Name=RES,24R9,1%,0.063W,0402
R3: library part RES,1k,1%,0.063W,0402, "RES 1K OHM 1% 1/16W 0402", Manufacturer 1="Vishay Dale", Manufacturer 1 Part Number=CRCW04021K00FKED, CreatedBy="Kevin Heyer", HelpURL=https://www.vishay.com/docs/20035/dcrcwe3.pdf, Part Name=RES,1k,1%,0.063W,0402
R5 R7 R9 R11 R13 R15: library part RES,1k,5%,0.063W,0402, "1 kOhms ï¿½5% 0.063W, 1/16W Chip Resistor 0402 (1005 Metric) Automotive AEC-Q200 Thick Film", Manufacturer 1="Stackpole Electronics Inc", Manufacturer 1 Part Number=RMCF0402JT1K00, Vendor 1 Part Number=RMCF0402JT1K00CT-ND, CreatedBy="Judd Foster", HelpURL=https://www.seielect.com/catalog/sei-rmcf_rmcp.pdf, Part Name=RES,1k,5%,0.063W,0402, Vendor 1=DIgikey
R17 R18 R19 R20 R21 R22: library part RES,Omit,0402, Manufacturer 1=N/A, CreatedBy="Judd Foster", HelpURL=N/A, Manufacturer 1 Part Number=N/A, Part Name=RES,Omit,0402, Vendor 1=N/A, Vendor 1 Part Number=N/A
SW1 SW2 SW3 SW4 SW5 SW6: library part "Switch,Tactile,SPST-NO,RA,TH,TS36CA-0.6 250gf 031", "Switch,Tactile,SPST-NO,RA,TH,TS36CA-0.6 250gf 031", Manufacturer 1="SHOU HAN", Manufacturer 1 Part Number="TS36CA-0.6 250gf 031", Vendor 1 Part Number=C2906288, CreatedBy="Kevin Heyer", HelpURL=https://www.lcsc.com/datasheet/C2906288.pdf, Part Name="Switch,Tactile,SPST-NO,RA,TH,TS36CA-0.6 250gf 031", Vendor 1=LCSC
U1: library part IC,MCU,QFN48,STM32G473CBU6, "IC MCU 32BIT 128KB FLSH 48UFQFPN", Manufacturer 1="ST Microelectronics", CreatedBy="Kevin Heyer", HelpURL=https://www.st.com/resource/en/datasheet/stm32g473cb.pdf, Manufacturer 1 Part Number=STM32G473CBU6, Part Name=IC,MCU,QFN48,STM32G473CBU6
U2: "Voltage Level Translator Bidirectional 1 Circuit 2 Channel 24Mbps 8-VSSOP", Manufacturer 1="Texas Instruments", Vendor 1 Part Number=296-28109-1-ND, CreatedBy="Judd Foster", HelpURL=https://www.ti.com/general/docs/suppproductinfo.tsp?distId=10&gotoUrl=https%3A%2F%2Fwww.ti.com%2Flit%2Fgpn%2Ftca9406, Manufacturer 1 Part Number=TCA9406DCUR, Part Name=TCA9406DCUR, Vendor 1=DigiKey
Y1: library part XTAL,8.0000MHz,OSC,50ppm,15pF,SMD, "XTAL,8.0000MHz,OSC,50ppm,15pF,SMD", Manufacturer 1="ECS Inc.", Manufacturer 1 Part Number=ECS-3225MV-080-BN-TR3, CreatedBy="Kevin Heyer", HelpURL=https://ecsxtal.com/store/pdf/ECS-3225MV.pdf, Part Name=XTAL,8.0000MHz,OSC,50ppm,15pF,SMD

## Via types
v1: diameter 0.45, hole 0.3, L1 to L6, tented both sides, 205 vias
v2: diameter 0.45, hole 0.3, L1 to L6, 40 vias

## Nets (pads, with @x,y where several pads share a name; then routed paths per layer and width w, separated by ;. In a path a pad name is that pad's centre, name@x,y a point inside that pad or via, vN(x,y) a via of type N, cw(c..) or ccw(c..) an arc to the next point about the centre after c; other vN are vias at no path point)
+3V3: C1.1 C4.1 C6.2 C7.1 C8.2 C9.1 C10.1 C11.1 C18.2 C19.2 D1.A DS1.2 J5.1 J6.1 J7.12 L1.2 L2.1 P1.1 R1.2 R17.2 R18.2 R19.2 R20.2 SW1.1 SW2.1 SW3.1 SW5.1 SW6.1 U1.1 U1.20 U1.23 U1.35 U1.48 U2.3 U2.6 Y1.1 Y1.4 | length 284.7
  L1 w0.2: v1(37.167,8.611) 37.194,8.585 C6.2@37.4,8.585 37.4,8.84 38.14,9.579 U1.20@38.14,9.583 ; U1.35@43.977,11.705 43.977,11.702 44.38,11.3 v1(44.38,11.298)
  L1 w0.3: v1(38.863,8.181) U1.23@39.205,8.523 ; U1.1@39.558,16.831 39.646,16.743 39.83,16.926 39.967,16.926 v1(39.996,16.955) 40.024,16.926 40.17,16.926 40.354,16.743 U1.48@40.442,16.831 ; U2.6@42.45,22.45 43.589,22.45 43.959,22.82 v1(44,22.82) 44.041,22.82 44.411,22.45 U2.3@45.55,22.45 46.458,22.45 46.675,22.667 v1(46.675,22.792)
  L4 w0.2: v1(9.75,15.055) 9.75,19.75 13.7,23.7 13.7,26.2 9.651,30.249 v1(8.429,30.249) 8.474,30.295 8.474,30.546 9.177,31.249 9.541,31.249 12.791,34.499 v1(12.791,38.018) 12.791,38.098 14.791,38.098 15.246,38.553 21.736,38.553 22.191,38.098 24.191,38.098 24.646,38.553 31.136,38.553 36.518,33.17 DS1.2@39,33.17 42.495,29.675 50.185,29.675 v1(51,28.86)
  L4 w0.45: v1(37.167,8.611) 37.167,5.799 37.782,5.184
  L4 w0.5: v1(9.75,15.055) 9.877,15.055 9.978,15.157 19.268,15.157 ; 37.782,5.184 37.784,5.182 38.25,5.182 38.252,5.184 39.597,5.184 ; v1(38.863,8.181) 39.597,7.447 39.597,5.184 ; 39.597,4.726 39.597,3.296 38.299,1.998 ; 39.597,4.776 39.597,5.184 ; v1(39.996,16.955) 39.996,18.696 40,18.7 40,20.901 v1(38.1,22.8) ; v1(44.38,11.298) 45.407,10.27 v1(45.407,2.72) 46.632,1.495 ; J5.1@71,21.46 J5.1@70.65,21.46 ; 19.268,15.157 24.217,20.105 32.961,20.105 35.656,22.8 v1(38.1,22.8) ; 19.268,15.157 23.8,10.625 23.8,7.6 24.995,6.405 25.151,6.405 25.505,6.051 25.505,5.895 30.7,0.7 37.001,0.7 38.299,1.998 ; v1(38.1,22.8) 38.921,23.621 45.845,23.621 v1(46.675,22.792) 48.007,21.46 J5.1@70.65,21.46 ; 38.299,1.998 39.627,0.67 45.807,0.67 46.632,1.495 ; 46.632,1.495 51.557,1.495 52.782,2.72 57.707,2.72 66.795,11.807 66.795,17.605 J5.1@70.65,21.46
  L6 w0.2: J7.12@7.945,30.249 v1(8.429,30.249) ; v1(8.85,5.8) 8.85,14.475 9.375,15 9.695,15 v1(9.75,15.055) ; R18.2@35.475,30.63 35.475,31.575 36.525,32.625 v1(36.525,33.175) ; R17.2@35.5,28.09 R18.2@35.5,30.63 ; L1.2@36.407,8.093 36.582,8.093 37.1,8.611 v1(37.167,8.611) 37.167,8.623 37.985,9.441 37.985,9.815 37.875,9.924 C7.1@37.875,10.145
  L6 w0.3: R19.2@43.45,22.82 v1(44,22.82) R20.2@44.55,22.82
  L6 w0.4: C7.1@37.818,10.393 C7.1@37.818,10.264 37.73,10.352 37.73,10.494 38.11,10.873 38.11,11.328 Y1.1@38.958,12.177 Y1.4@40.09,13.308 40.16,13.238 40.9,12.498 40.9,11.785 40.988,11.697 C1.1@40.988,11.556 ; C4.1@39.757,16.387 39.67,16.474 39.67,16.615 39.996,16.941 v1(39.996,16.955) 40.009,16.955 C11.1@40.218,17.163 ; C11.1@40.219,17.163 40.307,17.251 40.449,17.251 C11.1@40.537,17.163
  L6 w0.5: v1(36.525,33.175) 36.528,33.172 38.998,33.172 DS1.2@39,33.17 ; v1(38.863,8.181) 38.96,8.181 39.217,8.439 C9.1@39.288,8.439 ; Y1.4@40.16,13.238 40.655,13.238 40.926,13.509 42.166,13.509 42.43,13.245 42.501,13.245 C10.1@42.589,13.333 ; C10.1@42.502,13.175 v1(44.38,11.298)
  other v1: 57.707,2.8 22.56,11.865 22.191,38.018 31.591,38.018
+3V3.CMN: J2.10 J4.10 L2.2 | length 2.1
  L1 w0.2: L2.2@23.54,11.865 J2.10@25.5,11.865 v1(25.65,11.865)
+5V0: C20.2 J5.8 L3.1 R21.2 R22.2 U2.7 | length 55.7
  L1 w0.2: v1(32.433,16.934) 32.44,16.941 L3.1@32.44,16.945
  L1 w0.3: v1(41.325,21.642) 41.325,21.767 41.508,21.95 U2.7@42.45,21.95
  L6 w0.3: R21.2@43.45,21.613 v1(44,21.613) R22.2@44.55,21.613 ; 44,20.723 44.023,20.7
  L6 w0.5: v1(32.433,16.934) 37.141,21.642 v1(41.325,21.642) 41.325,21.376 42.001,20.7 44.023,20.7 56.537,20.7 60.24,16.997 60.275,16.997 60.31,16.962 60.31,16.927 62.23,16.927 62.25,16.907 62.285,16.872 62.841,16.872 68.1,11.613 68.1,6.23 70.65,3.68 J5.8@71,3.68 ; R21.2@43.45,21.613 v1(44,21.613) ; 44,20.723 v1(44,21.613) ; R22.2@44.55,21.613 v1(44,21.613)
+5V0AMP: J2.1 J2.3 J2.5 J4.1 J4.3 J4.5 L3.2 | length 4.6
  L1 w0.5: v1(29.35,14.405) v1(29.35,15.675) v1(29.35,16.945) J2.1@29.5,16.945 L3.2@31.46,16.945
-5V0AMP: J2.2 J2.4 J2.6 J4.2 J4.4 J4.6 | length 2.5
  L1 w0.5: v1(25.65,14.405) v1(25.65,15.675) v1(25.65,16.945)
Analog0: L13.1 U1.25 | length 10.9
  L1 w0.165: U1.25@40.442,8.169 v1(40.784,7.827)
  L3 w0.131: v1(32.44,11.865) 34.068,10.237 35.995,10.237 36.48,10.723 37.005,10.723 39.9,7.827 v1(40.784,7.827)
Analog1: L14.1 U1.31 | length 14.4
  L1 w0.165: U1.31@42.563,10.29 v1(42.905,9.949)
  L3 w0.131: v1(32.44,10.595) 33.153,9.882 36.567,9.882 39.213,7.236 40.951,7.236 41.275,7.56 41.275,8.043 41.07,8.248 41.07,8.709 42.31,9.949 v1(42.905,9.949)
Analog2: L15.1 U1.26 | length 12.1
  L1 w0.165: U1.26@40.795,8.52 41.763,7.552 v1(41.763,7.55)
  L3 w0.131: v1(32.44,9.325) 35.746,9.325 38.299,6.772 40.986,6.772 v1(41.763,7.55)
Analog3: L16.1 U1.16 | length 5.5
  L1 w0.165: L16.1@32.44,8.055 33.787,8.055 U1.16@36.73,10.997
Analog4: L17.1 U1.27 | length 24.2
  L1 w0.165: U1.27@41.149,8.876 v1(41.491,8.534)
  L3 w0.131: v1(22.56,9.325) 23.185,8.7 26.124,8.7 26.709,9.285 28.189,9.285 28.774,8.7 35.523,8.7 38.016,6.207 41.41,6.207 42.4,7.197 42.4,7.625 v1(41.491,8.534)